# Altium PCB 1H-WSL007-2-1.PcbDoc (part 1 of 4)
Units mil, origin at the board's own origin, x right, y up, seen from the top; angles counter-clockwise.
Board outline 6030 x 4220 mil, 4 copper layers (Top Layer, Mid-Layer 1, Mid-Layer 2, Bottom Layer), stack 90.192 mil thick; 369 components, 15 nets, 801 pads, 1963 vias.
Unrouted connection lines stored in the file: 45.
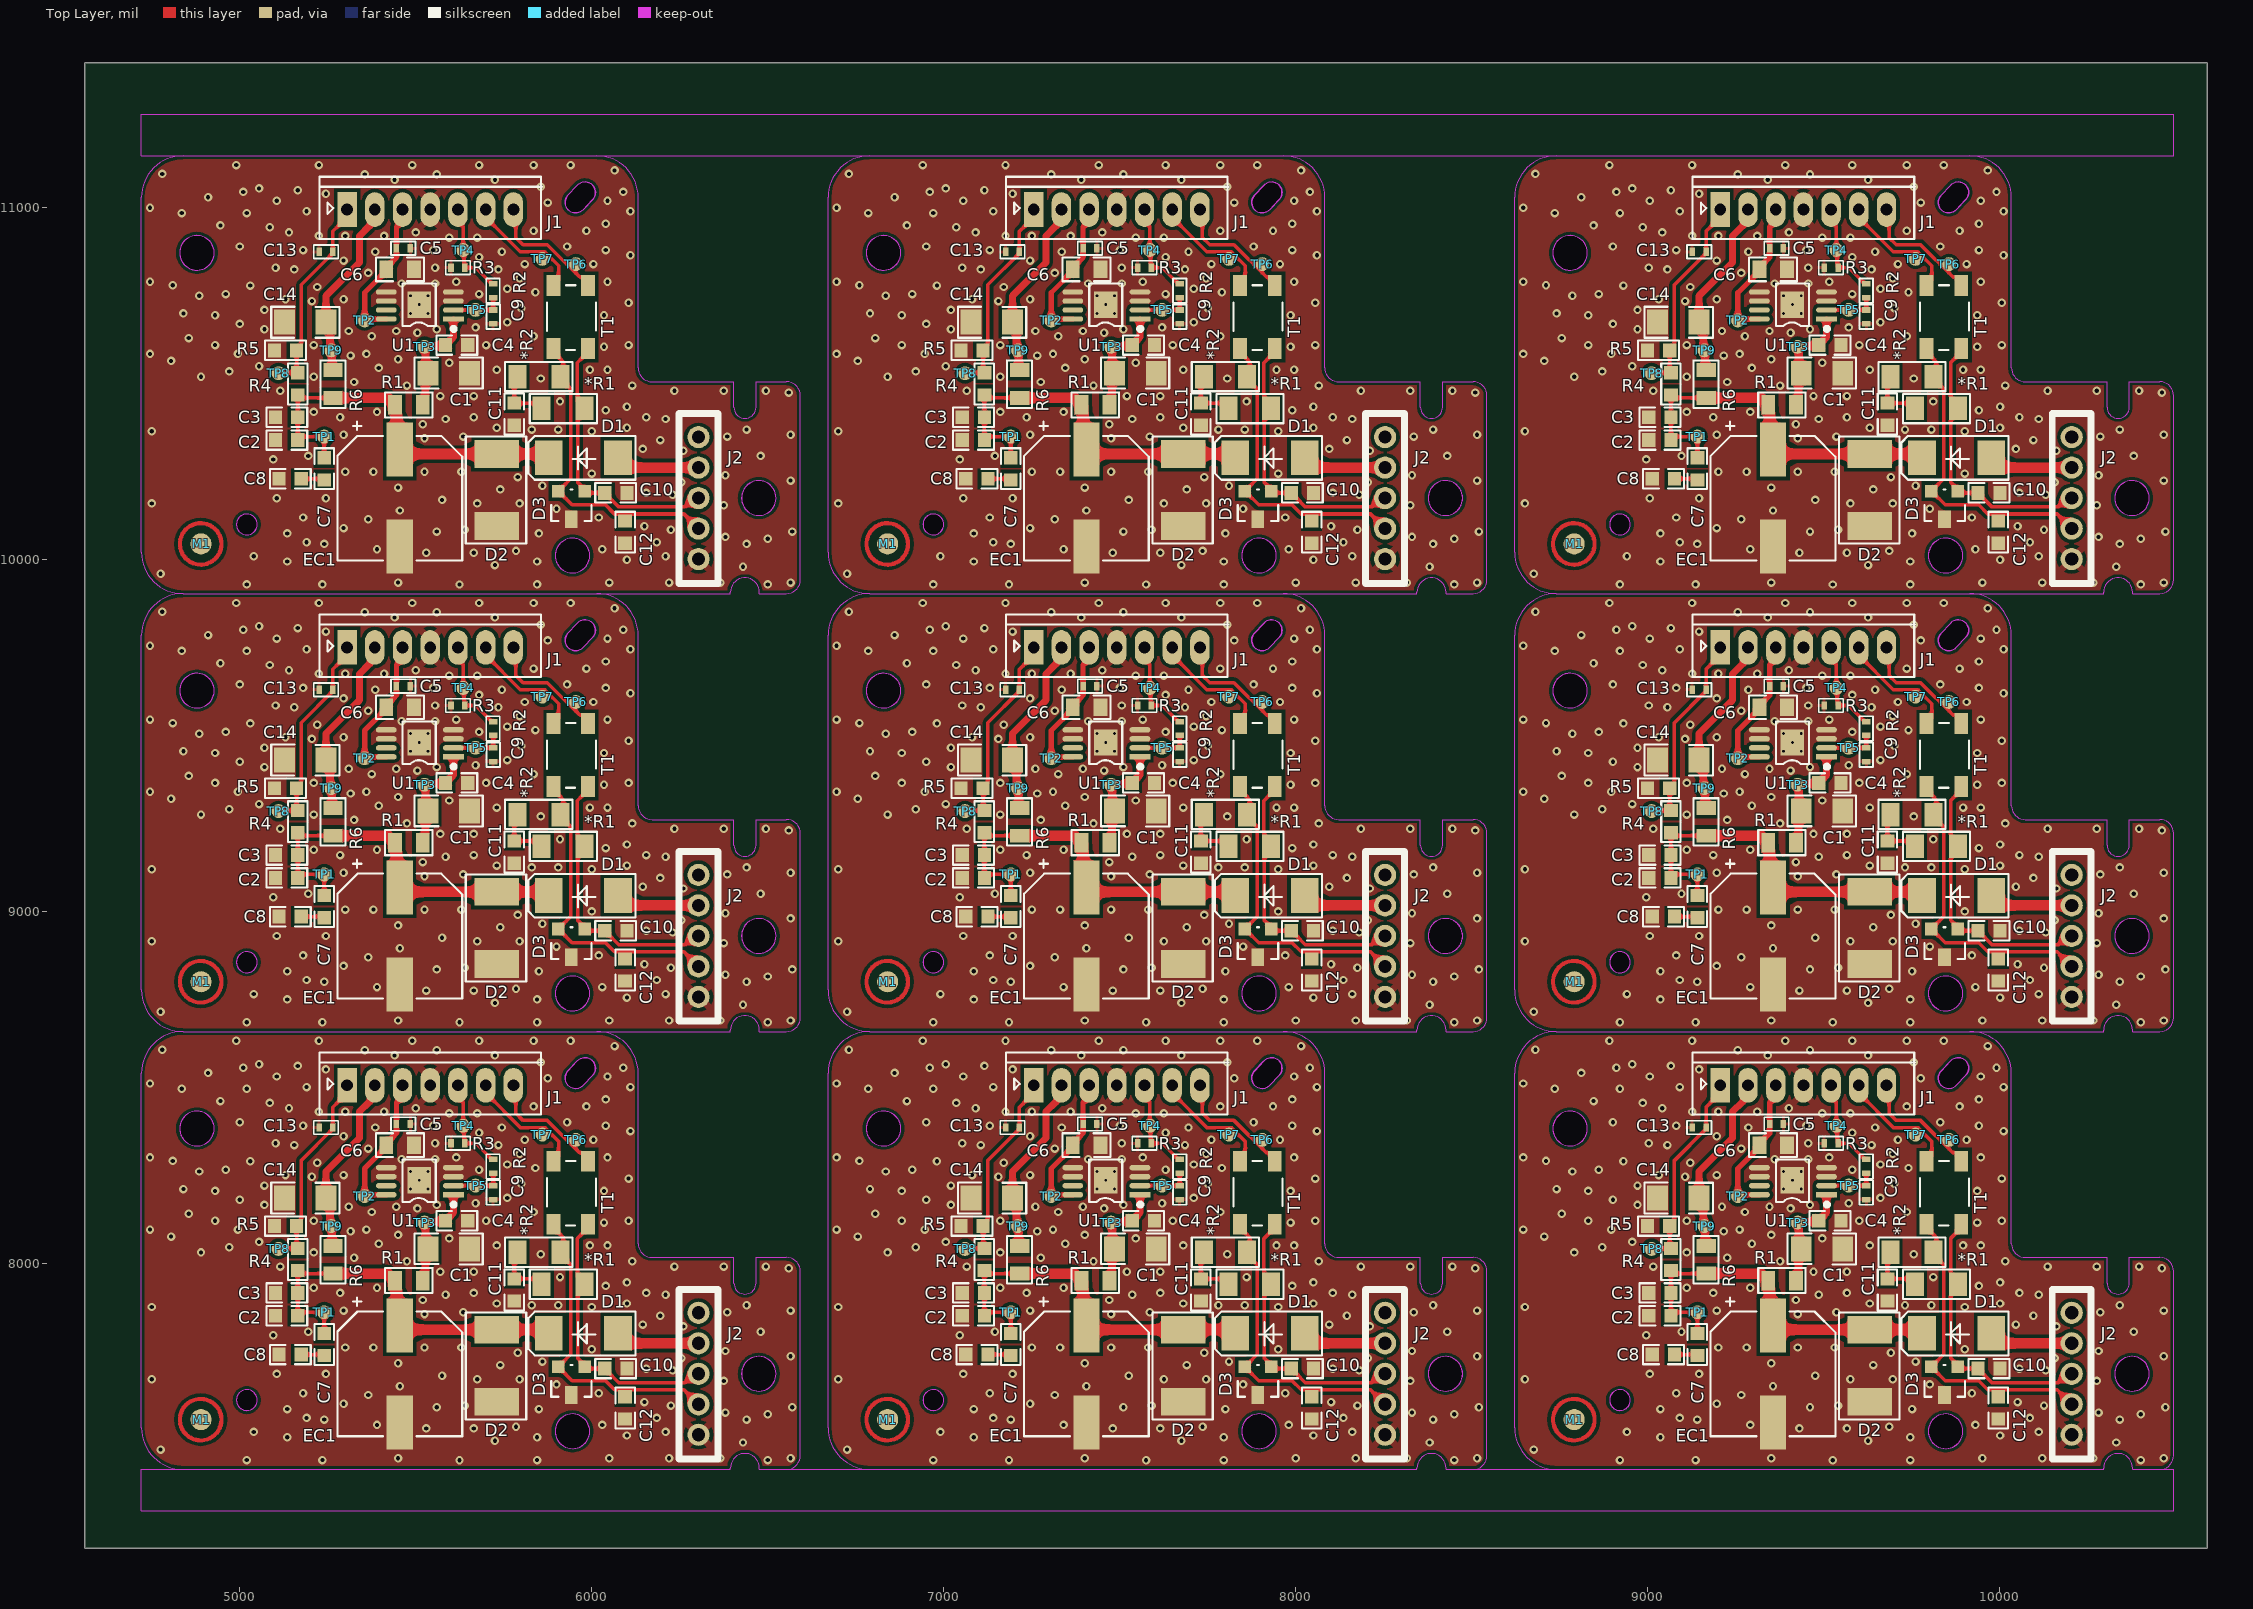
[diagram p0: Top Layer view]
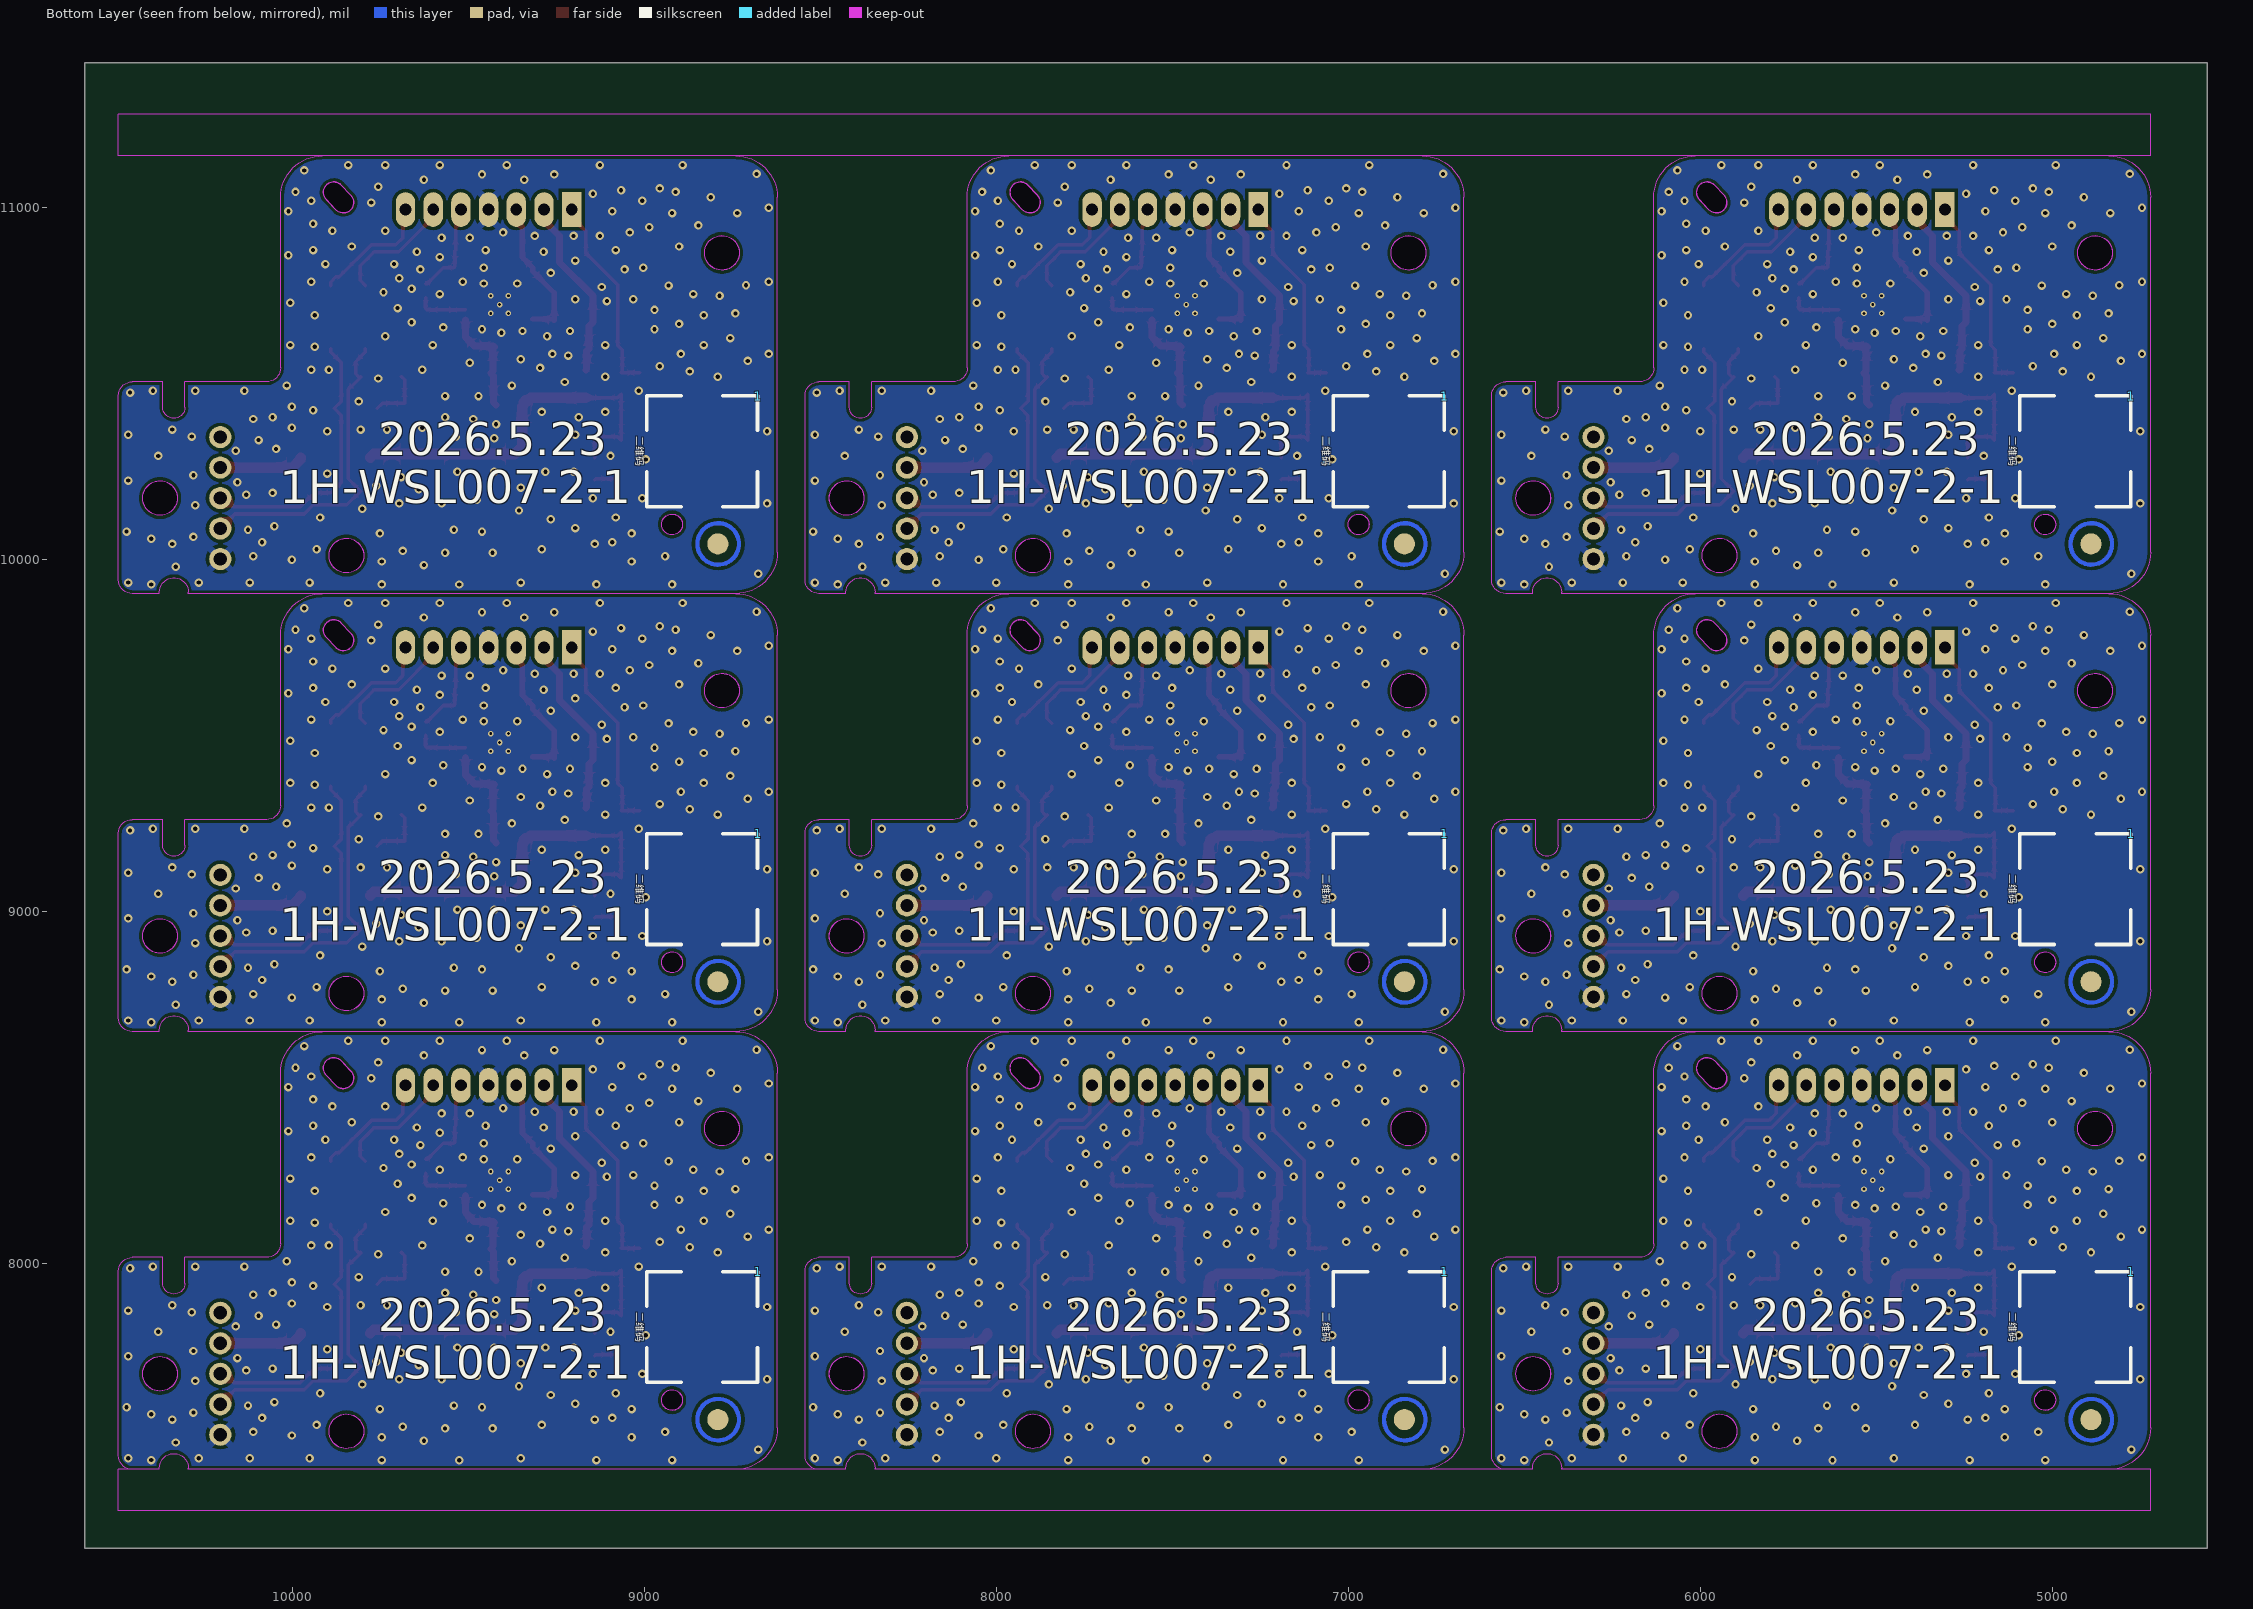
[diagram p1: Bottom Layer view, seen from below]
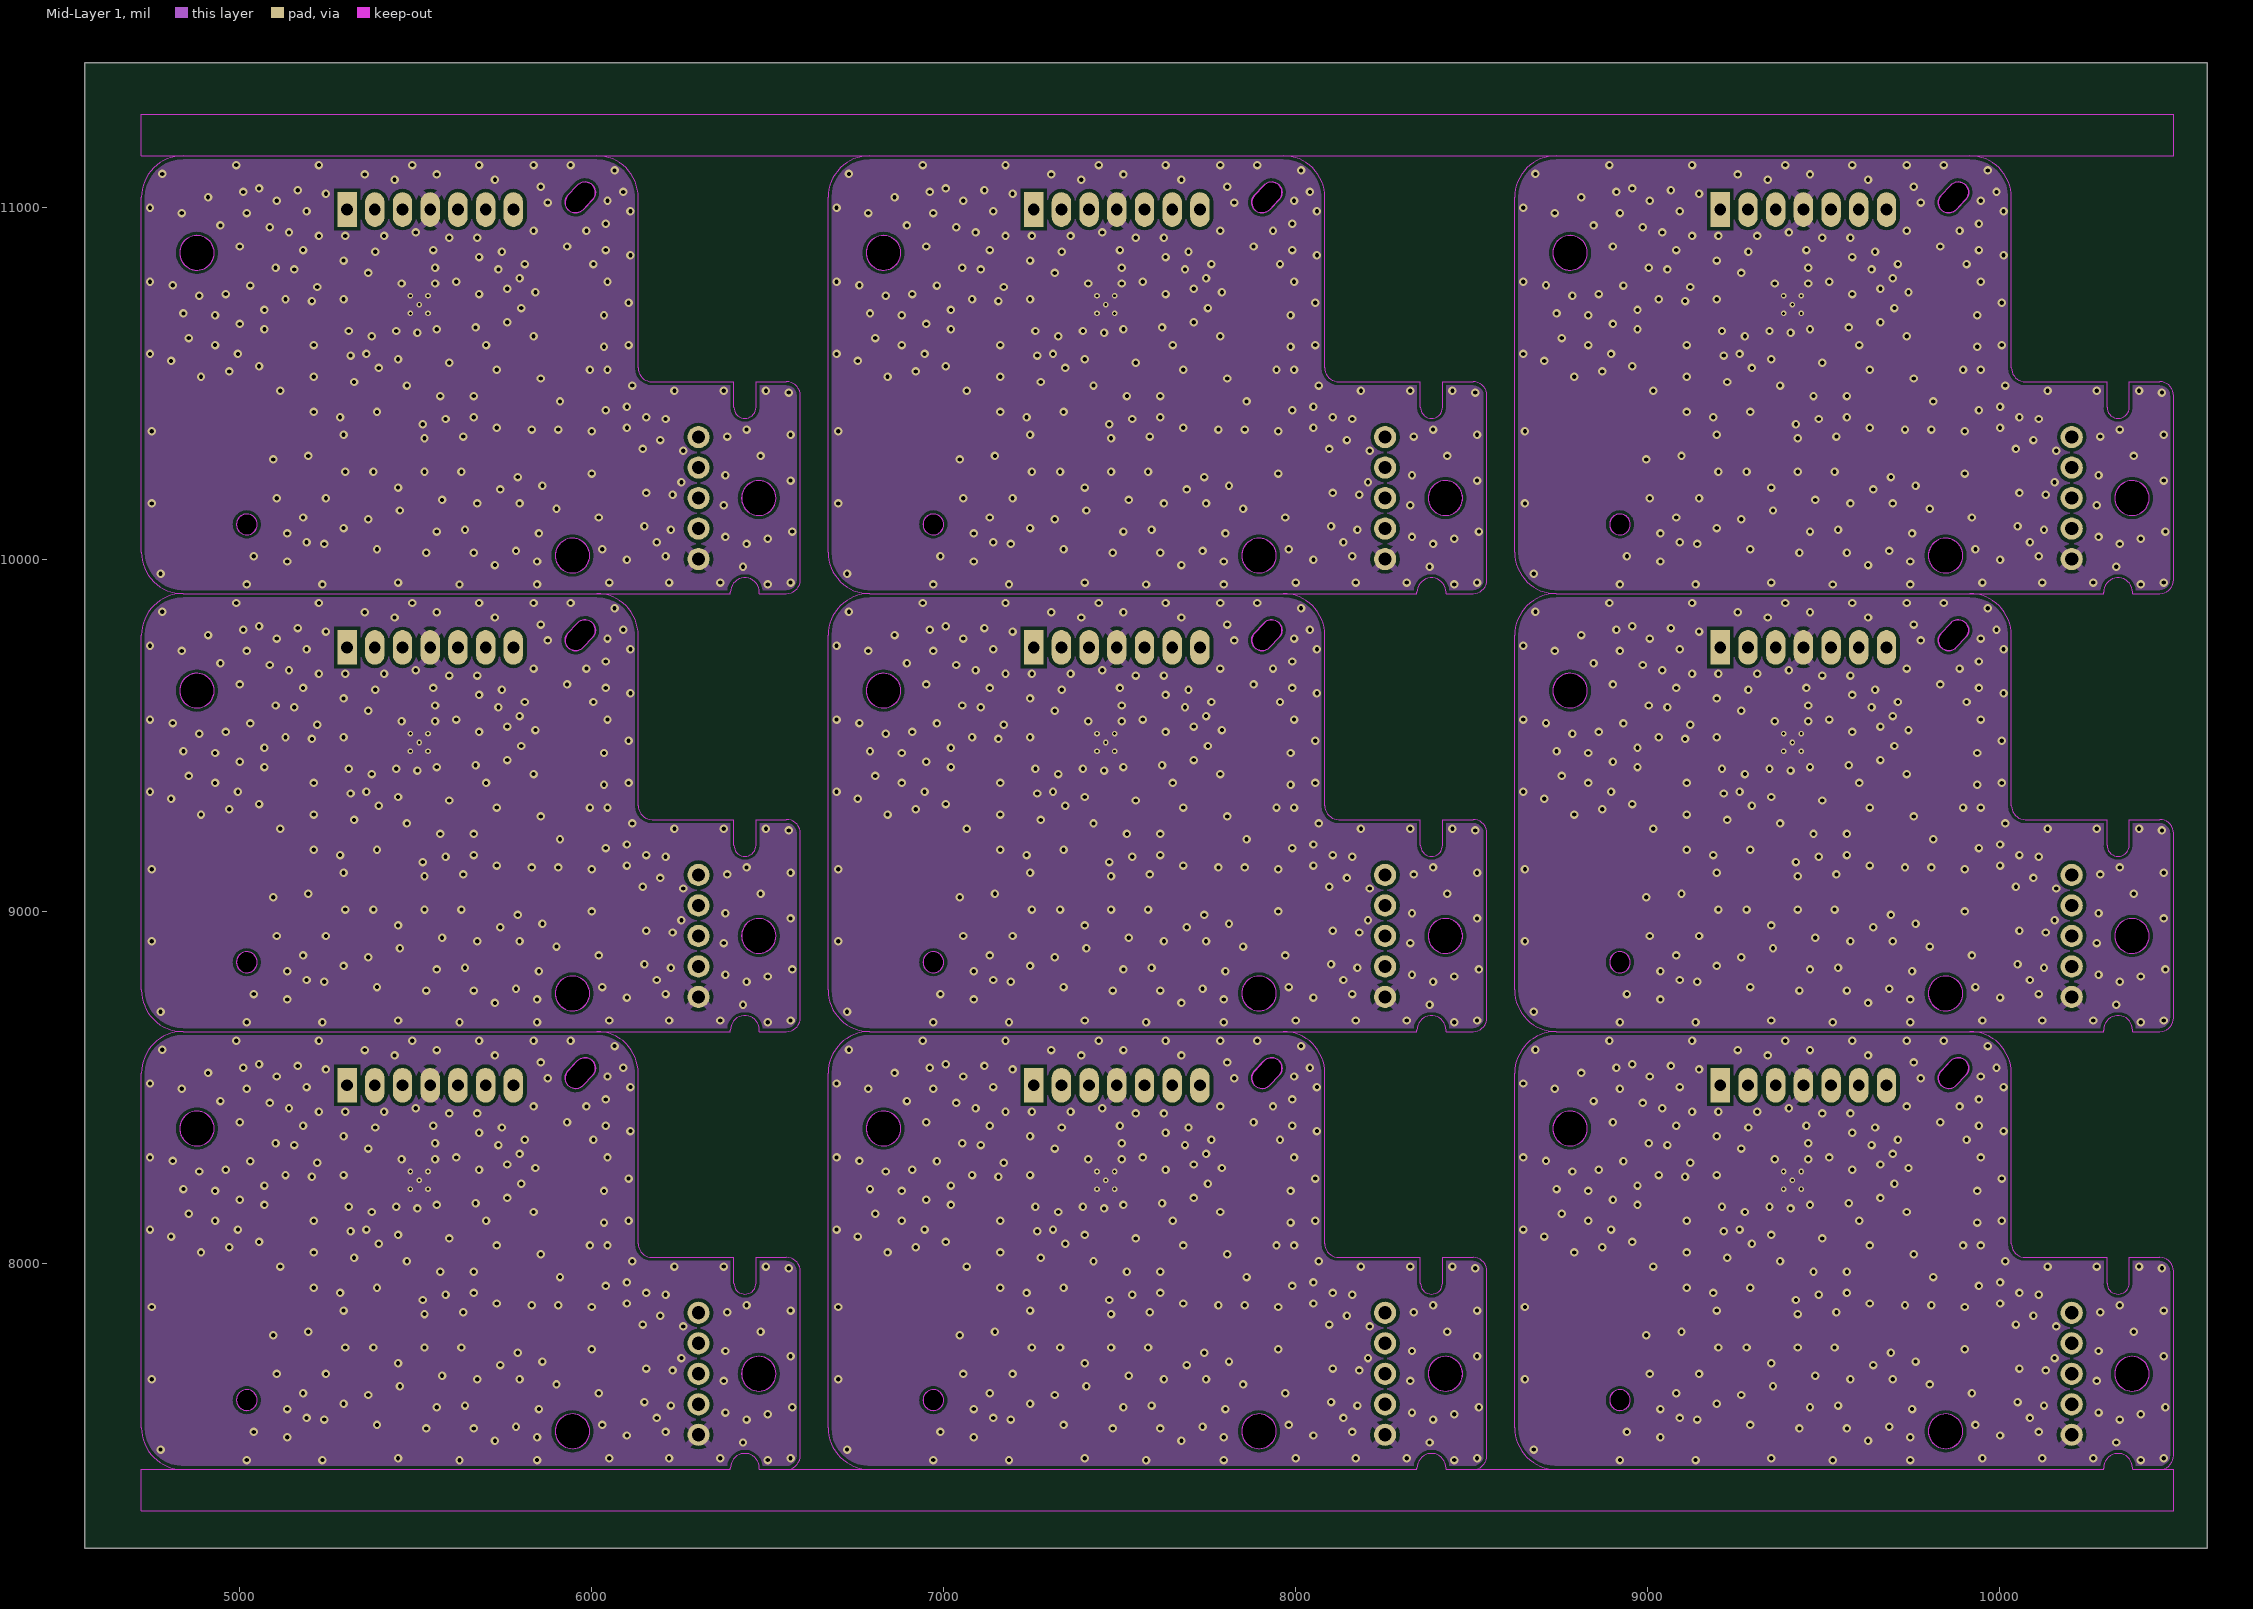
[diagram p2: Mid-Layer 1]
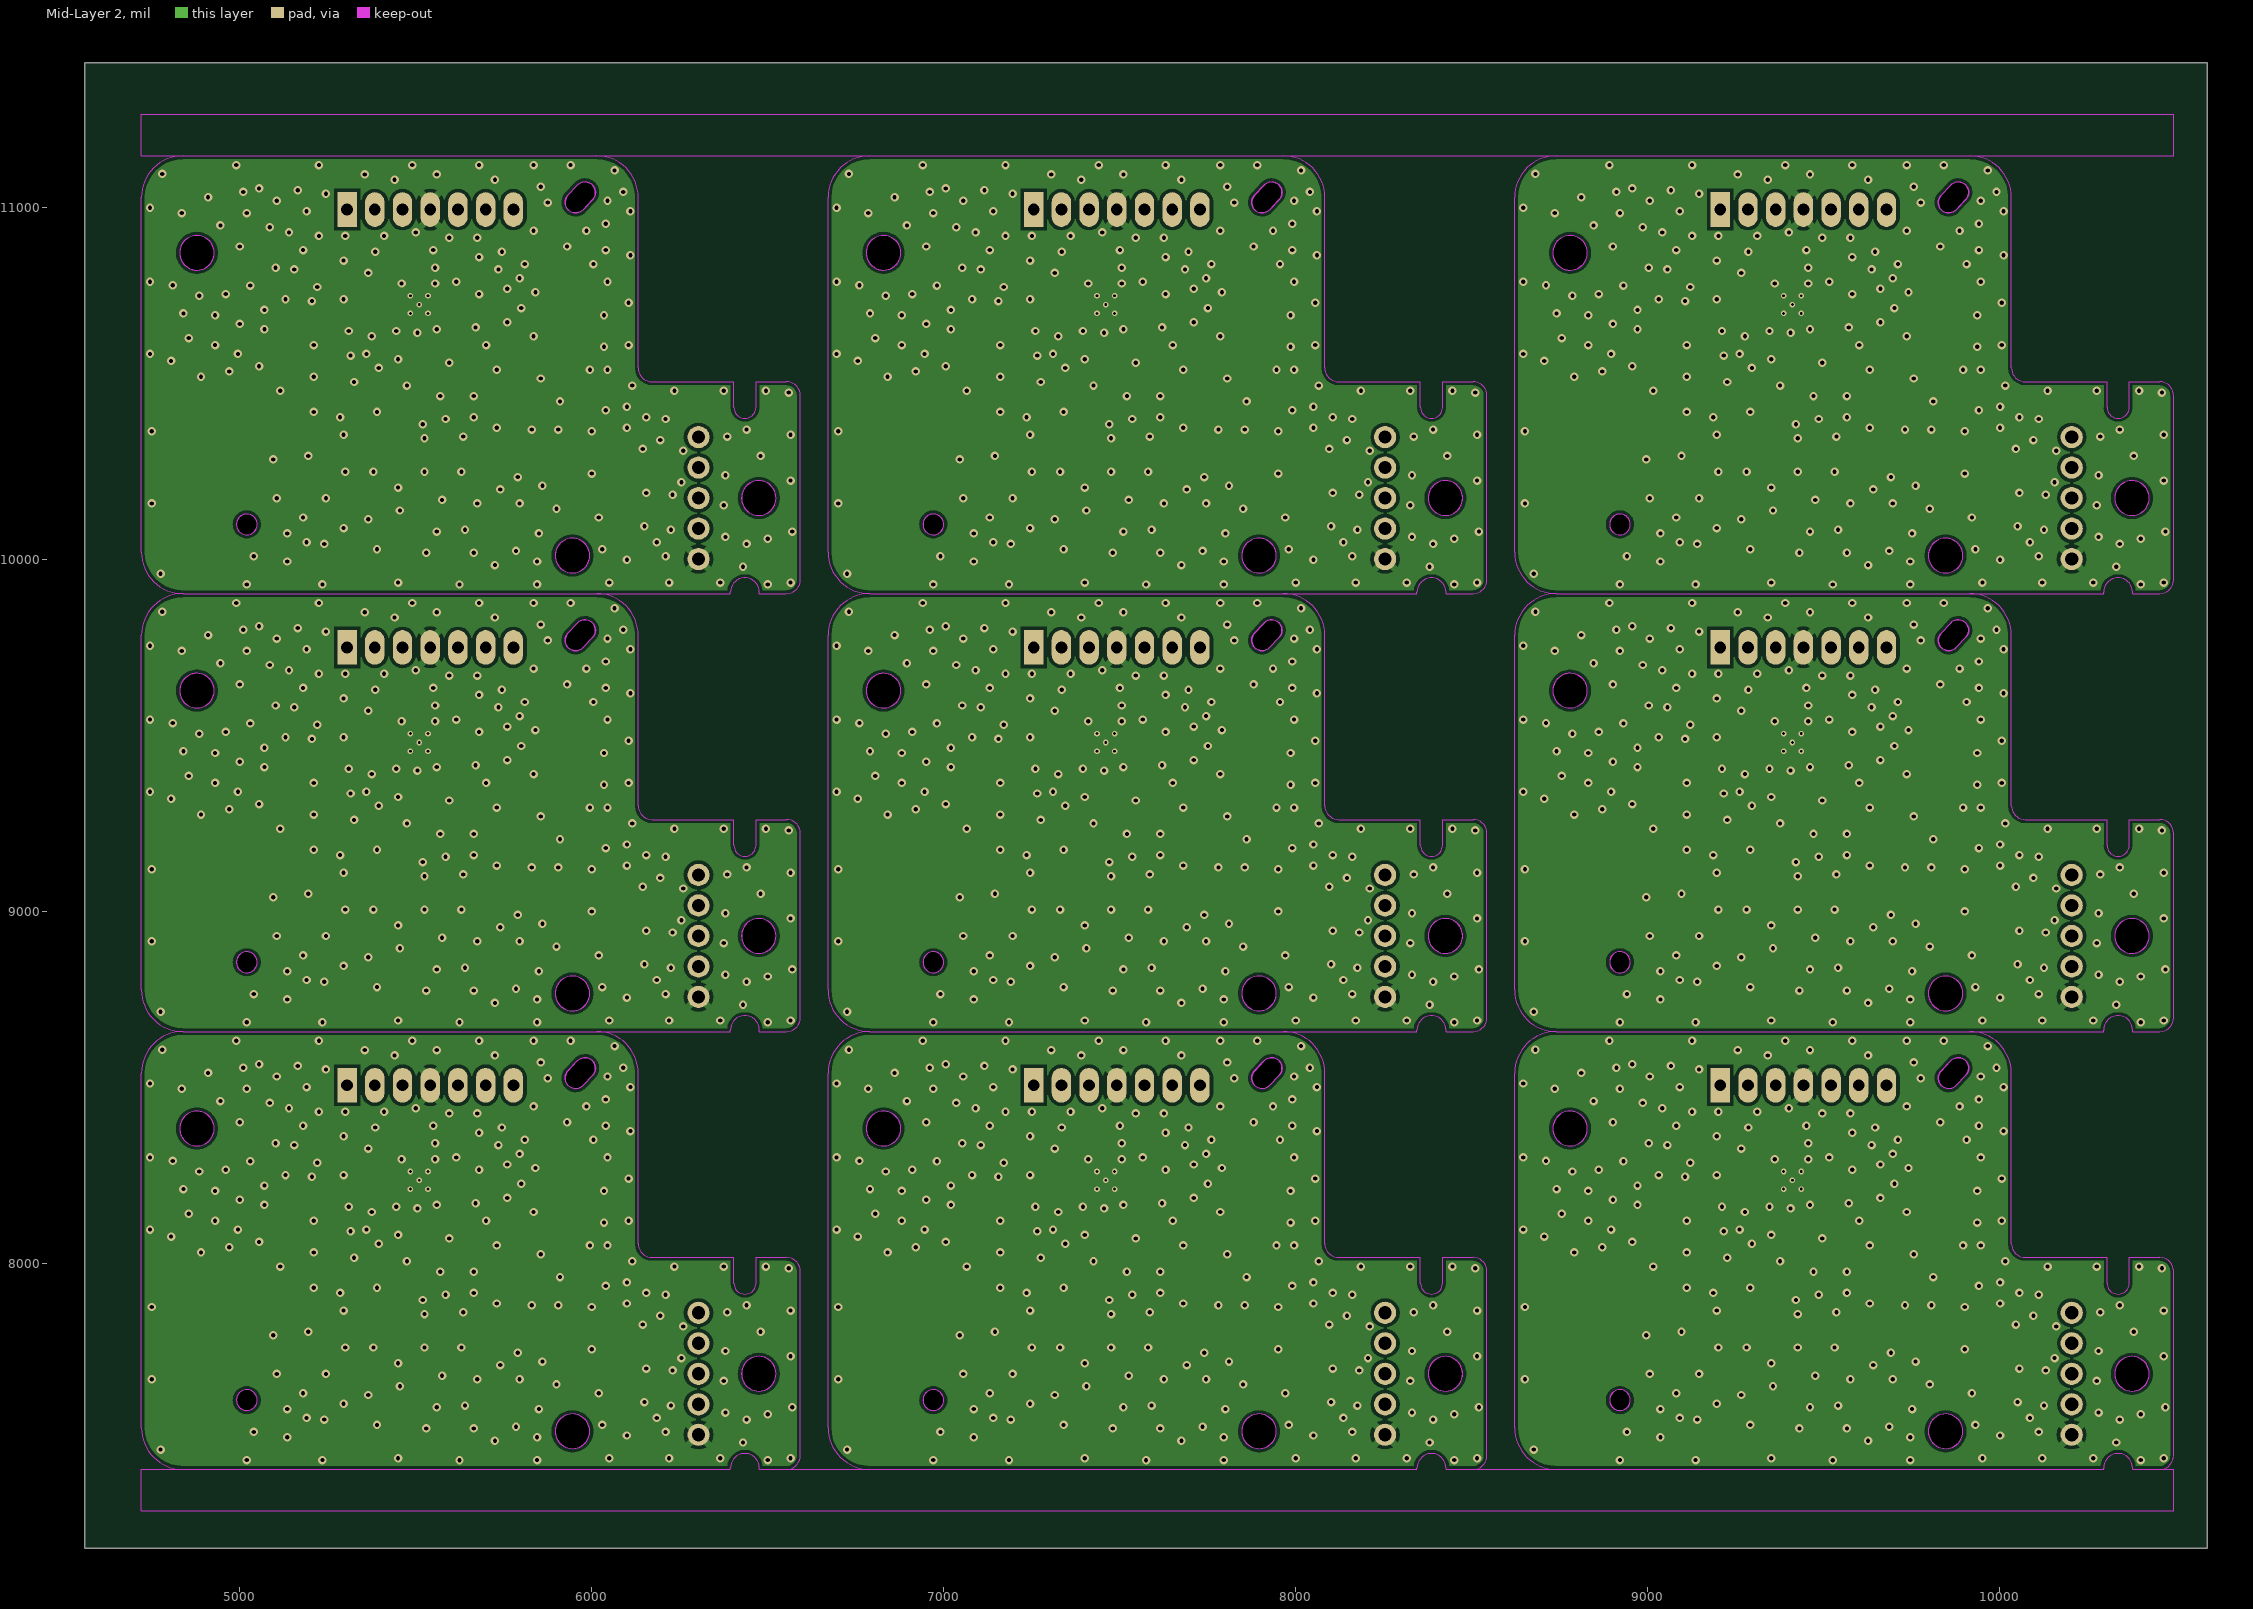
[diagram p3: Mid-Layer 2]

## Layer stack, top to bottom
Top Solder: solder mask 0.4, Solder Resist, Dk 3.5
Top Layer: signal copper 1.4
Dielectric 1: dielectric 59.3921, FR-4, Dk 4.8
Mid-Layer 1: signal copper 1.4
Dielectric2: dielectric 12.6, FR-4, Dk 4.8
Mid-Layer 2: signal copper 1.4
Dielectric3: dielectric 12.6, FR-4, Dk 4.8
Bottom Layer: signal copper 1.4
Bottom Solder: solder mask 0.4, Solder Resist, Dk 3.5

## Board outline
4560,7190 4560,11410 10590,11410 10590,7190
cut-out: 8892.12,10098.67 ccw(c8921.65,10098.67) 8921.65,10069.14 ccw(c8921.65,10098.67) 8951.18,10098.67 ccw(c8921.65,10098.67) 8921.65,10128.19 ccw(c8921.65,10098.67)
cut-out: 9797.64,10010.08 ccw(c9846.85,10010.08) 9846.85,9960.87 ccw(c9846.85,10010.08) 9896.06,10010.08 ccw(c9846.85,10010.08) 9846.85,10059.3 ccw(c9846.85,10010.08)
cut-out: 10327.17,10173.47 ccw(c10376.38,10173.47) 10376.38,10124.26 ccw(c10376.38,10173.47) 10425.59,10173.47 ccw(c10376.38,10173.47) 10376.38,10222.68 ccw(c10376.38,10173.47)
cut-out: 8730.71,10870.32 ccw(c8779.92,10870.32) 8779.92,10821.11 ccw(c8779.92,10870.32) 8829.14,10870.32 ccw(c8779.92,10870.32) 8779.92,10919.53 ccw(c8779.92,10870.32)
cut-out: 9834.01,11033.84 cw(c9834.25,11033.67) 9834.02,11033.85 cw(c9834.21,11033.7) 9834.03,11033.87 9860.99,11062.53 9861.01,11062.55 cw(c9882.71,11042.14) 9912.5,11042.14 cw(c9882.71,11042.14) 9904.42,11021.73 cw(c9904.26,11021.88) 9904.4,11021.72 9877.45,10993.05 cw(c9877.29,10993.2) 9877.44,10993.04 ccw(c9877.11,10993.36) 9877.45,10993.05 9877.44,10993.04 cw(c9855.74,11013.46) 9834.02,11033.85 cw(c9834.77,11033.16) 9834.04,11033.87 ccw(c9843.73,11025.41)
cut-out: 8892.12,8854.57 ccw(c8921.65,8854.57) 8921.65,8825.05 ccw(c8921.65,8854.57) 8951.18,8854.57 ccw(c8921.65,8854.57) 8921.65,8884.1 ccw(c8921.65,8854.57)
cut-out: 9797.64,8765.99 ccw(c9846.85,8765.99) 9846.85,8716.78 ccw(c9846.85,8765.99) 9896.06,8765.99 ccw(c9846.85,8765.99) 9846.85,8815.2 ccw(c9846.85,8765.99)
cut-out: 10327.17,8929.38 ccw(c10376.38,8929.38) 10376.38,8880.16 ccw(c10376.38,8929.38) 10425.59,8929.38 ccw(c10376.38,8929.38) 10376.38,8978.59 ccw(c10376.38,8929.38)
cut-out: 8730.71,9626.23 ccw(c8779.92,9626.23) 8779.92,9577.01 ccw(c8779.92,9626.23) 8829.14,9626.23 ccw(c8779.92,9626.23) 8779.92,9675.44 ccw(c8779.92,9626.23)
cut-out: 9834.01,9789.75 cw(c9834.25,9789.58) 9834.02,9789.76 cw(c9834.21,9789.61) 9834.03,9789.77 9860.99,9818.44 9861.01,9818.45 cw(c9882.71,9798.05) 9912.5,9798.05 cw(c9882.71,9798.05) 9904.42,9777.64 cw(c9904.26,9777.79) 9904.4,9777.62 9877.45,9748.96 cw(c9877.29,9749.1) 9877.44,9748.95 ccw(c9877.11,9749.26) 9877.45,9748.96 9877.44,9748.95 cw(c9855.74,9769.37) 9834.02,9789.76 cw(c9834.77,9789.07) 9834.04,9789.77 ccw(c9843.73,9781.32)
cut-out: 6941.34,10098.67 ccw(c6970.86,10098.67) 6970.86,10069.14 ccw(c6970.86,10098.67) 7000.39,10098.67 ccw(c6970.86,10098.67) 6970.86,10128.19 ccw(c6970.86,10098.67)
cut-out: 7846.85,10010.08 ccw(c7896.06,10010.08) 7896.06,9960.87 ccw(c7896.06,10010.08) 7945.28,10010.08 ccw(c7896.06,10010.08) 7896.06,10059.3 ccw(c7896.06,10010.08)
cut-out: 8376.38,10173.47 ccw(c8425.59,10173.47) 8425.59,10124.26 ccw(c8425.59,10173.47) 8474.8,10173.47 ccw(c8425.59,10173.47) 8425.59,10222.68 ccw(c8425.59,10173.47)
cut-out: 6779.92,10870.32 ccw(c6829.14,10870.32) 6829.14,10821.11 ccw(c6829.14,10870.32) 6878.35,10870.32 ccw(c6829.14,10870.32) 6829.14,10919.53 ccw(c6829.14,10870.32)
cut-out: 7883.23,11033.84 cw(c7883.46,11033.67) 7883.24,11033.85 cw(c7883.42,11033.7) 7883.25,11033.87 7910.2,11062.53 7910.22,11062.55 cw(c7931.92,11042.14) 7961.72,11042.14 cw(c7931.92,11042.14) 7953.63,11021.73 cw(c7953.47,11021.88) 7953.61,11021.72 7926.66,10993.05 cw(c7926.51,10993.2) 7926.65,10993.04 ccw(c7926.32,10993.36) 7926.66,10993.05 7926.65,10993.04 cw(c7904.95,11013.46) 7883.24,11033.85 cw(c7883.98,11033.16) 7883.25,11033.87 ccw(c7892.94,11025.41)
cut-out: 6941.34,8854.57 ccw(c6970.86,8854.57) 6970.86,8825.05 ccw(c6970.86,8854.57) 7000.39,8854.57 ccw(c6970.86,8854.57) 6970.86,8884.1 ccw(c6970.86,8854.57)
cut-out: 7846.85,8765.99 ccw(c7896.06,8765.99) 7896.06,8716.78 ccw(c7896.06,8765.99) 7945.28,8765.99 ccw(c7896.06,8765.99) 7896.06,8815.2 ccw(c7896.06,8765.99)
cut-out: 8376.38,8929.38 ccw(c8425.59,8929.38) 8425.59,8880.16 ccw(c8425.59,8929.38) 8474.8,8929.38 ccw(c8425.59,8929.38) 8425.59,8978.59 ccw(c8425.59,8929.38)
cut-out: 6779.92,9626.23 ccw(c6829.14,9626.23) 6829.14,9577.01 ccw(c6829.14,9626.23) 6878.35,9626.23 ccw(c6829.14,9626.23) 6829.14,9675.44 ccw(c6829.14,9626.23)
cut-out: 7883.23,9789.75 cw(c7883.46,9789.58) 7883.24,9789.76 cw(c7883.42,9789.61) 7883.25,9789.77 7910.2,9818.44 7910.22,9818.45 cw(c7931.92,9798.05) 7961.72,9798.05 cw(c7931.92,9798.05) 7953.63,9777.64 cw(c7953.47,9777.79) 7953.61,9777.62 7926.66,9748.96 cw(c7926.51,9749.1) 7926.65,9748.95 ccw(c7926.32,9749.26) 7926.66,9748.96 7926.65,9748.95 cw(c7904.95,9769.37) 7883.24,9789.76 cw(c7883.98,9789.07) 7883.25,9789.77 ccw(c7892.94,9781.32)
cut-out: 4990.55,10098.67 ccw(c5020.08,10098.67) 5020.08,10069.14 ccw(c5020.08,10098.67) 5049.6,10098.67 ccw(c5020.08,10098.67) 5020.08,10128.19 ccw(c5020.08,10098.67)
cut-out: 5896.06,10010.08 ccw(c5945.28,10010.08) 5945.28,9960.87 ccw(c5945.28,10010.08) 5994.49,10010.08 ccw(c5945.28,10010.08) 5945.28,10059.3 ccw(c5945.28,10010.08)
cut-out: 6425.59,10173.47 ccw(c6474.8,10173.47) 6474.8,10124.26 ccw(c6474.8,10173.47) 6524.02,10173.47 ccw(c6474.8,10173.47) 6474.8,10222.68 ccw(c6474.8,10173.47)
cut-out: 4829.14,10870.32 ccw(c4878.35,10870.32) 4878.35,10821.11 ccw(c4878.35,10870.32) 4927.56,10870.32 ccw(c4878.35,10870.32) 4878.35,10919.53 ccw(c4878.35,10870.32)
cut-out: 5932.44,11033.84 cw(c5932.67,11033.67) 5932.45,11033.85 cw(c5932.63,11033.7) 5932.46,11033.87 5959.41,11062.53 5959.43,11062.55 cw(c5981.14,11042.14) 6010.93,11042.14 cw(c5981.14,11042.14) 6002.84,11021.73 cw(c6002.68,11021.88) 6002.82,11021.72 5975.87,10993.05 cw(c5975.72,10993.2) 5975.86,10993.04 ccw(c5975.53,10993.36) 5975.87,10993.05 5975.86,10993.04 cw(c5954.17,11013.46) 5932.45,11033.85 cw(c5933.19,11033.16) 5932.46,11033.87 ccw(c5942.16,11025.41)
cut-out: 4990.55,8854.57 ccw(c5020.08,8854.57) 5020.08,8825.05 ccw(c5020.08,8854.57) 5049.6,8854.57 ccw(c5020.08,8854.57) 5020.08,8884.1 ccw(c5020.08,8854.57)
cut-out: 5896.06,8765.99 ccw(c5945.28,8765.99) 5945.28,8716.78 ccw(c5945.28,8765.99) 5994.49,8765.99 ccw(c5945.28,8765.99) 5945.28,8815.2 ccw(c5945.28,8765.99)
cut-out: 6425.59,8929.38 ccw(c6474.8,8929.38) 6474.8,8880.16 ccw(c6474.8,8929.38) 6524.02,8929.38 ccw(c6474.8,8929.38) 6474.8,8978.59 ccw(c6474.8,8929.38)
cut-out: 4829.14,9626.23 ccw(c4878.35,9626.23) 4878.35,9577.01 ccw(c4878.35,9626.23) 4927.56,9626.23 ccw(c4878.35,9626.23) 4878.35,9675.44 ccw(c4878.35,9626.23)
cut-out: 5932.44,9789.75 cw(c5932.67,9789.58) 5932.45,9789.76 cw(c5932.63,9789.61) 5932.46,9789.77 5959.41,9818.44 5959.43,9818.45 cw(c5981.14,9798.05) 6010.93,9798.05 cw(c5981.14,9798.05) 6002.84,9777.64 cw(c6002.68,9777.79) 6002.82,9777.62 5975.87,9748.96 cw(c5975.72,9749.1) 5975.86,9748.95 ccw(c5975.53,9749.26) 5975.87,9748.96 5975.86,9748.95 cw(c5954.17,9769.37) 5932.45,9789.76 cw(c5933.19,9789.07) 5932.46,9789.77 ccw(c5942.16,9781.32)
cut-out: 4990.55,7610.48 ccw(c5020.08,7610.48) 5020.08,7580.95 ccw(c5020.08,7610.48) 5049.6,7610.48 ccw(c5020.08,7610.48) 5020.08,7640.01 ccw(c5020.08,7610.48)
cut-out: 5896.06,7521.9 ccw(c5945.28,7521.9) 5945.28,7472.68 ccw(c5945.28,7521.9) 5994.49,7521.9 ccw(c5945.28,7521.9) 5945.28,7571.11 ccw(c5945.28,7521.9)
cut-out: 6425.59,7685.28 ccw(c6474.8,7685.28) 6474.8,7636.07 ccw(c6474.8,7685.28) 6524.02,7685.28 ccw(c6474.8,7685.28) 6474.8,7734.49 ccw(c6474.8,7685.28)
cut-out: 4829.14,8382.13 ccw(c4878.35,8382.13) 4878.35,8332.92 ccw(c4878.35,8382.13) 4927.56,8382.13 ccw(c4878.35,8382.13) 4878.35,8431.35 ccw(c4878.35,8382.13)
cut-out: 5932.44,8545.65 cw(c5932.67,8545.48) 5932.45,8545.67 cw(c5932.63,8545.51) 5932.46,8545.68 5959.41,8574.34 5959.43,8574.36 cw(c5981.14,8553.95) 6010.93,8553.95 cw(c5981.14,8553.95) 6002.84,8533.55 cw(c6002.68,8533.7) 6002.82,8533.53 5975.87,8504.86 cw(c5975.72,8505.01) 5975.86,8504.85 ccw(c5975.53,8505.17) 5975.87,8504.87 5975.86,8504.85 cw(c5954.17,8525.27) 5932.45,8545.67 cw(c5933.19,8544.97) 5932.46,8545.68 ccw(c5942.16,8537.23)
cut-out: 6941.34,7610.48 ccw(c6970.86,7610.48) 6970.86,7580.95 ccw(c6970.86,7610.48) 7000.39,7610.48 ccw(c6970.86,7610.48) 6970.86,7640.01 ccw(c6970.86,7610.48)
cut-out: 7846.85,7521.9 ccw(c7896.06,7521.9) 7896.06,7472.68 ccw(c7896.06,7521.9) 7945.28,7521.9 ccw(c7896.06,7521.9) 7896.06,7571.11 ccw(c7896.06,7521.9)
cut-out: 8376.38,7685.28 ccw(c8425.59,7685.28) 8425.59,7636.07 ccw(c8425.59,7685.28) 8474.8,7685.28 ccw(c8425.59,7685.28) 8425.59,7734.49 ccw(c8425.59,7685.28)
cut-out: 6779.92,8382.13 ccw(c6829.14,8382.13) 6829.14,8332.92 ccw(c6829.14,8382.13) 6878.35,8382.13 ccw(c6829.14,8382.13) 6829.14,8431.35 ccw(c6829.14,8382.13)
cut-out: 7883.23,8545.65 cw(c7883.46,8545.48) 7883.24,8545.67 cw(c7883.42,8545.51) 7883.25,8545.68 7910.2,8574.34 7910.22,8574.36 cw(c7931.92,8553.95) 7961.72,8553.95 cw(c7931.92,8553.95) 7953.63,8533.55 cw(c7953.47,8533.7) 7953.61,8533.53 7926.66,8504.86 cw(c7926.51,8505.01) 7926.65,8504.85 ccw(c7926.32,8505.17) 7926.66,8504.87 7926.65,8504.85 cw(c7904.95,8525.27) 7883.24,8545.67 cw(c7883.98,8544.97) 7883.25,8545.68 ccw(c7892.94,8537.23)
cut-out: 8892.12,7610.48 ccw(c8921.65,7610.48) 8921.65,7580.95 ccw(c8921.65,7610.48) 8951.18,7610.48 ccw(c8921.65,7610.48) 8921.65,7640.01 ccw(c8921.65,7610.48)
cut-out: 9797.64,7521.9 ccw(c9846.85,7521.9) 9846.85,7472.68 ccw(c9846.85,7521.9) 9896.06,7521.9 ccw(c9846.85,7521.9) 9846.85,7571.11 ccw(c9846.85,7521.9)
cut-out: 10327.17,7685.28 ccw(c10376.38,7685.28) 10376.38,7636.07 ccw(c10376.38,7685.28) 10425.59,7685.28 ccw(c10376.38,7685.28) 10376.38,7734.49 ccw(c10376.38,7685.28)
cut-out: 8730.71,8382.13 ccw(c8779.92,8382.13) 8779.92,8332.92 ccw(c8779.92,8382.13) 8829.14,8382.13 ccw(c8779.92,8382.13) 8779.92,8431.35 ccw(c8779.92,8382.13)
cut-out: 9834.01,8545.65 cw(c9834.25,8545.48) 9834.02,8545.67 cw(c9834.21,8545.51) 9834.03,8545.68 9860.99,8574.34 9861.01,8574.36 cw(c9882.71,8553.95) 9912.5,8553.95 cw(c9882.71,8553.95) 9904.42,8533.55 cw(c9904.26,8533.7) 9904.4,8533.53 9877.45,8504.86 cw(c9877.29,8505.01) 9877.44,8504.85 ccw(c9877.11,8505.17) 9877.45,8504.87 9877.44,8504.85 cw(c9855.74,8525.27) 9834.02,8545.67 cw(c9834.77,8544.97) 9834.04,8545.68 ccw(c9843.73,8537.23)

## Design rules (kind name [scope] priority, off if disabled: settings)
Clearance [All] p1: gap=9.5 ignorepadtopadclearanceinfootprint=FALSE except(0: Arc-Hole Track-Hole SMDPad-Hole THPad-Hole Via-Hole Fill-Hole Poly-Hole Region-Hole Text-Hole)
PlaneConnect [All] p1: planeconnectstyle=Direct reliefexpansion=20 reliefentries=4 reliefconductorwidth=10 reliefairgap=10
PolygonConnect [All] p1: connectstyle=Direct reliefconductorwidth=10 reliefentries=4 polygonreliefangle="90 Angle" airgapwidth=10
RoutingVias [All] p1: holewidth=28 width=50 viastyle="Through Hole" minholewidth=8 minwidth=16 maxholewidth=28 maxwidth=50
SolderMaskExpansion [All] p1: expansion=4
Width [All] p1: maxlimit=30 minlimit=10 preferedwidth=10 midlayer1_maxwidth=10 midlayer2_maxwidth=10 minimp=50.000000 maximp=50.000000 favimp=50.000000
29 further rules are at their usual default settings.

## Components (designator, comment, footprint, x,y, rotation, side; value= is the part's Value field where it differs from the comment)
1 "二微码" GF-二维码框 8676.57,10463.19 r270 bottom
1 "二微码" GF-二维码框 8676.57,9219.09 r270 bottom
1 "二微码" GF-二维码框 6725.79,10463.19 r270 bottom
1 "二微码" GF-二维码框 6725.79,9219.09 r270 bottom
1 "二微码" GF-二维码框 4775,10463.19 r270 bottom
1 "二微码" GF-二维码框 4775,9219.09 r270 bottom
1 "二微码" GF-二维码框 4775,7975 r270 bottom
1 "二微码" GF-二维码框 6725.79,7975 r270 bottom
1 "二微码" GF-二维码框 8676.57,7975 r270 bottom
*R1 "3.3K/1206±1%" R1206-GF 9820.55,10428.19 r0 top
*R1 "3.3K/1206±1%" R1206-GF 9820.55,9184.09 r0 top
*R1 "3.3K/1206±1%" R1206-GF 7869.76,10428.19 r0 top
*R1 "3.3K/1206±1%" R1206-GF 7869.76,9184.09 r0 top
*R1 "3.3K/1206±1%" R1206-GF 5918.98,10428.19 r0 top
*R1 "3.3K/1206±1%" R1206-GF 5918.98,9184.09 r0 top
*R1 "3.3K/1206±1%" R1206-GF 5918.98,7940 r0 top
*R1 "3.3K/1206±1%" R1206-GF 7869.76,7940 r0 top
*R1 "3.3K/1206±1%" R1206-GF 9820.55,7940 r0 top
*R2 "3.3K/1206±1%" R1206-GF 9751.57,10518.19 r180 top
*R2 "3.3K/1206±1%" R1206-GF 9751.57,9274.09 r180 top
*R2 "3.3K/1206±1%" R1206-GF 7800.79,10518.19 r180 top
*R2 "3.3K/1206±1%" R1206-GF 7800.79,9274.09 r180 top
*R2 "3.3K/1206±1%" R1206-GF 5850,10518.19 r180 top
*R2 "3.3K/1206±1%" R1206-GF 5850,9274.09 r180 top
*R2 "3.3K/1206±1%" R1206-GF 5850,8030 r180 top
*R2 "3.3K/1206±1%" R1206-GF 7800.79,8030 r180 top
*R2 "3.3K/1206±1%" R1206-GF 9751.57,8030 r180 top
C1 "4.7UF/50V" C1206-GF 9554.68,10528.19 r180 top
C1 "4.7UF/50V" C1206-GF 9554.68,9284.09 r180 top
C1 "4.7UF/50V" C1206-GF 7603.9,10528.19 r180 top
C1 "4.7UF/50V" C1206-GF 7603.9,9284.09 r180 top
C1 "4.7UF/50V" C1206-GF 5653.11,10528.19 r180 top
C1 "4.7UF/50V" C1206-GF 5653.11,9284.09 r180 top
C1 "4.7UF/50V" C1206-GF 5653.11,8040 r180 top
C1 "4.7UF/50V" C1206-GF 7603.9,8040 r180 top
C1 "4.7UF/50V" C1206-GF 9554.68,8040 r180 top
C2 "47NF" C0603-GF 9066.57,10338.19 r180 top
C2 "47NF" C0603-GF 9066.57,9094.09 r180 top
C2 "47NF" C0603-GF 7115.79,10338.19 r180 top
C2 "47NF" C0603-GF 7115.79,9094.09 r180 top
C2 "47NF" C0603-GF 5165,10338.19 r180 top
C2 "47NF" C0603-GF 5165,9094.09 r180 top
C2 "47NF" C0603-GF 5165,7850 r180 top
C2 "47NF" C0603-GF 7115.79,7850 r180 top
C2 "47NF" C0603-GF 9066.57,7850 r180 top
C3 "470NF" C0603-GF 9066.57,10403.19 r180 top
C3 "470NF" C0603-GF 9066.57,9159.09 r180 top
C3 "470NF" C0603-GF 7115.79,10403.19 r180 top
C3 "470NF" C0603-GF 7115.79,9159.09 r180 top
C3 "470NF" C0603-GF 5165,10403.19 r180 top
C3 "470NF" C0603-GF 5165,9159.09 r180 top
C3 "470NF" C0603-GF 5165,7915 r180 top
C3 "470NF" C0603-GF 7115.79,7915 r180 top
C3 "470NF" C0603-GF 9066.57,7915 r180 top
C4 "100NF/100V" C0603-GF 9549.57,10608.19 r180 top
C4 "100NF/100V" C0603-GF 9549.57,9364.09 r180 top
C4 "100NF/100V" C0603-GF 7598.78,10608.19 r180 top
C4 "100NF/100V" C0603-GF 7598.78,9364.09 r180 top
C4 "100NF/100V" C0603-GF 5647.99,10608.19 r180 top
C4 "100NF/100V" C0603-GF 5647.99,9364.09 r180 top
C4 "100NF/100V" C0603-GF 5647.99,8120 r180 top
C4 "100NF/100V" C0603-GF 7598.78,8120 r180 top
C4 "100NF/100V" C0603-GF 9549.57,8120 r180 top
C5 "100NF" C0402-GF 9366.57,10883.19 r180 top
C5 "100NF" C0402-GF 9366.57,9639.09 r180 top
C5 "100NF" C0402-GF 7415.79,10883.19 r180 top
C5 "100NF" C0402-GF 7415.79,9639.09 r180 top
C5 "100NF" C0402-GF 5465,10883.19 r180 top
C5 "100NF" C0402-GF 5465,9639.09 r180 top
C5 "100NF" C0402-GF 5465,8395 r180 top
C5 "100NF" C0402-GF 7415.79,8395 r180 top
C5 "100NF" C0402-GF 9366.57,8395 r180 top
C6 "10UF/10V" C0805-GF 9317.83,10823.19 r0 top
C6 "10UF/10V" C0805-GF 9317.83,9579.09 r0 top
C6 "10UF/10V" C0805-GF 7367.05,10823.19 r0 top
C6 "10UF/10V" C0805-GF 7367.05,9579.09 r0 top
C6 "10UF/10V" C0805-GF 5416.26,10823.19 r0 top
C6 "10UF/10V" C0805-GF 5416.26,9579.09 r0 top
C6 "10UF/10V" C0805-GF 5416.26,8335 r0 top
C6 "10UF/10V" C0805-GF 7367.05,8335 r0 top
C6 "10UF/10V" C0805-GF 9317.83,8335 r0 top
C7 "103/100V" C0603-GF 9141.57,10288.19 r270 top
C7 "103/100V" C0603-GF 9141.57,9044.09 r270 top
C7 "103/100V" C0603-GF 7190.79,10288.19 r270 top
C7 "103/100V" C0603-GF 7190.79,9044.09 r270 top
C7 "103/100V" C0603-GF 5240,10288.19 r270 top
C7 "103/100V" C0603-GF 5240,9044.09 r270 top
C7 "103/100V" C0603-GF 5240,7800 r270 top
C7 "103/100V" C0603-GF 7190.79,7800 r270 top
C7 "103/100V" C0603-GF 9141.57,7800 r270 top
C8 "103/100V" C0603-GF 9076.57,10228.19 r180 top
C8 "103/100V" C0603-GF 9076.57,8984.09 r180 top
C8 "103/100V" C0603-GF 7125.79,10228.19 r180 top
C8 "103/100V" C0603-GF 7125.79,8984.09 r180 top
C8 "103/100V" C0603-GF 5175,10228.19 r180 top
C8 "103/100V" C0603-GF 5175,8984.09 r180 top
C8 "103/100V" C0603-GF 5175,7740 r180 top
C8 "103/100V" C0603-GF 7125.79,7740 r180 top
C8 "103/100V" C0603-GF 9076.57,7740 r180 top
C9 "1NF" C0402-GF 9621.57,10688.19 r90 top
C9 "1NF" C0402-GF 9621.57,9444.09 r90 top
C9 "1NF" C0402-GF 7670.79,10688.19 r90 top
C9 "1NF" C0402-GF 7670.79,9444.09 r90 top
C9 "1NF" C0402-GF 5720,10688.19 r90 top
C9 "1NF" C0402-GF 5720,9444.09 r90 top
C9 "1NF" C0402-GF 5720,8200 r90 top
C9 "1NF" C0402-GF 7670.79,8200 r90 top
C9 "1NF" C0402-GF 9621.57,8200 r90 top
C10 "47PF/100V" C0603-GF 9938.58,10188.19 r0 top
C10 "47PF/100V" C0603-GF 9938.58,8944.09 r0 top
C10 "47PF/100V" C0603-GF 7987.8,10188.19 r0 top
C10 "47PF/100V" C0603-GF 7987.8,8944.09 r0 top
C10 "47PF/100V" C0603-GF 6037.01,10188.19 r0 top
C10 "47PF/100V" C0603-GF 6037.01,8944.09 r0 top
C10 "47PF/100V" C0603-GF 6037.01,7700 r0 top
C10 "47PF/100V" C0603-GF 7987.8,7700 r0 top
C10 "47PF/100V" C0603-GF 9938.58,7700 r0 top
C11 "4.7NF" C0603-GF 9681.57,10443.19 r270 top
C11 "4.7NF" C0603-GF 9681.57,9199.09 r270 top
C11 "4.7NF" C0603-GF 7730.79,10443.19 r270 top
C11 "4.7NF" C0603-GF 7730.79,9199.09 r270 top
C11 "4.7NF" C0603-GF 5780,10443.19 r270 top
C11 "4.7NF" C0603-GF 5780,9199.09 r270 top
C11 "4.7NF" C0603-GF 5780,7955 r270 top
C11 "4.7NF" C0603-GF 7730.79,7955 r270 top
C11 "4.7NF" C0603-GF 9681.57,7955 r270 top
C12 "47PF/100V" C0603-GF 9996.57,10045.19 r90 top
C12 "47PF/100V" C0603-GF 9996.57,8801.1 r90 top
C12 "47PF/100V" C0603-GF 8045.79,10045.19 r90 top
C12 "47PF/100V" C0603-GF 8045.79,8801.1 r90 top
C12 "47PF/100V" C0603-GF 6095,10045.19 r90 top
C12 "47PF/100V" C0603-GF 6095,8801.1 r90 top
C12 "47PF/100V" C0603-GF 6095,7557.01 r90 top
C12 "47PF/100V" C0603-GF 8045.79,7557.01 r90 top
C12 "47PF/100V" C0603-GF 9996.57,7557.01 r90 top
C13 "100NF" C0402-GF 9146.57,10873.19 r0 top
C13 "100NF" C0402-GF 9146.57,9629.09 r0 top
C13 "100NF" C0402-GF 7195.79,10873.19 r0 top
C13 "100NF" C0402-GF 7195.79,9629.09 r0 top
C13 "100NF" C0402-GF 5245,10873.19 r0 top
C13 "100NF" C0402-GF 5245,9629.09 r0 top
C13 "100NF" C0402-GF 5245,8385 r0 top
C13 "100NF" C0402-GF 7195.79,8385 r0 top
C13 "100NF" C0402-GF 9146.57,8385 r0 top
C14 "4.7UF/50V" C1206-GF 9028.46,10673.19 r0 top
C14 "4.7UF/50V" C1206-GF 9028.46,9429.09 r0 top
C14 "4.7UF/50V" C1206-GF 7077.68,10673.19 r0 top
C14 "4.7UF/50V" C1206-GF 7077.68,9429.09 r0 top
C14 "4.7UF/50V" C1206-GF 5126.89,10673.19 r0 top
C14 "4.7UF/50V" C1206-GF 5126.89,9429.09 r0 top
C14 "4.7UF/50V" C1206-GF 5126.89,8185 r0 top
C14 "4.7UF/50V" C1206-GF 7077.68,8185 r0 top
C14 "4.7UF/50V" C1206-GF 9028.46,8185 r0 top
D1 "GS1M-AU" D-SMA 9976.57,10288.19 r180 top
D1 "GS1M-AU" D-SMA 9976.57,9044.09 r180 top
D1 "GS1M-AU" D-SMA 8025.79,10288.19 r180 top
D1 "GS1M-AU" D-SMA 8025.79,9044.09 r180 top
D1 "GS1M-AU" D-SMA 6075,10288.19 r180 top
D1 "GS1M-AU" D-SMA 6075,9044.09 r180 top
D1 "GS1M-AU" D-SMA 6075,7800 r180 top
D1 "GS1M-AU" D-SMA 8025.79,7800 r180 top
D1 "GS1M-AU" D-SMA 9976.57,7800 r180 top
D2 "SMBJ33CA" D-SMB-TVS 9631.57,10093.19 r90 top
D2 "SMBJ33CA" D-SMB-TVS 9631.57,8849.09 r90 top
D2 "SMBJ33CA" D-SMB-TVS 7680.79,10093.19 r90 top
D2 "SMBJ33CA" D-SMB-TVS 7680.79,8849.09 r90 top
D2 "SMBJ33CA" D-SMB-TVS 5730,10093.19 r90 top
D2 "SMBJ33CA" D-SMB-TVS 5730,8849.09 r90 top
D2 "SMBJ33CA" D-SMB-TVS 5730,7605 r90 top
D2 "SMBJ33CA" D-SMB-TVS 7680.79,7605 r90 top
D2 "SMBJ33CA" D-SMB-TVS 9631.57,7605 r90 top
D3 "AESD24G2B" D-SOT-23 9844.41,10153.52 r180 top
D3 "AESD24G2B" D-SOT-23 9844.41,8909.43 r180 top
D3 "AESD24G2B" D-SOT-23 7893.62,10153.52 r180 top
D3 "AESD24G2B" D-SOT-23 7893.62,8909.43 r180 top
D3 "AESD24G2B" D-SOT-23 5942.84,10153.52 r180 top
D3 "AESD24G2B" D-SOT-23 5942.84,8909.43 r180 top
D3 "AESD24G2B" D-SOT-23 5942.84,7665.34 r180 top
D3 "AESD24G2B" D-SOT-23 7893.62,7665.34 r180 top
D3 "AESD24G2B" D-SOT-23 9844.41,7665.34 r180 top
EC1 "100UF/35V" EC8X10 9356.57,10173.19 r90 top
EC1 "100UF/35V" EC8X10 9356.57,8929.09 r90 top
EC1 "100UF/35V" EC8X10 7405.79,10173.19 r90 top
EC1 "100UF/35V" EC8X10 7405.79,8929.09 r90 top
EC1 "100UF/35V" EC8X10 5455,10173.19 r90 top
EC1 "100UF/35V" EC8X10 5455,8929.09 r90 top
EC1 "100UF/35V" EC8X10 5455,7685 r90 top
EC1 "100UF/35V" EC8X10 7405.79,7685 r90 top
EC1 "100UF/35V" EC8X10 9356.57,7685 r90 top
J1 "R2003HS-7P" 正耀-R2003HS-7P 9206.61,10993.19 r0 top
J1 "R2003HS-7P" 正耀-R2003HS-7P 9206.61,9749.09 r0 top
J1 "R2003HS-7P" 正耀-R2003HS-7P 7255.83,10993.19 r0 top
J1 "R2003HS-7P" 正耀-R2003HS-7P 7255.83,9749.09 r0 top
J1 "R2003HS-7P" 正耀-R2003HS-7P 5305.04,10993.19 r0 top
J1 "R2003HS-7P" 正耀-R2003HS-7P 5305.04,9749.09 r0 top
J1 "R2003HS-7P" 正耀-R2003HS-7P 5305.04,8505 r0 top
J1 "R2003HS-7P" 正耀-R2003HS-7P 7255.83,8505 r0 top
J1 "R2003HS-7P" 正耀-R2003HS-7P 9206.61,8505 r0 top
J2 "排针2.2mm-5" PH2.2-5 10205.12,10173.46 r90 top
J2 "排针2.2mm-5" PH2.2-5 10205.12,8929.37 r90 top
J2 "排针2.2mm-5" PH2.2-5 8254.33,10173.46 r90 top
J2 "排针2.2mm-5" PH2.2-5 8254.33,8929.37 r90 top
J2 "排针2.2mm-5" PH2.2-5 6303.54,10173.46 r90 top
J2 "排针2.2mm-5" PH2.2-5 6303.54,8929.37 r90 top
J2 "排针2.2mm-5" PH2.2-5 6303.54,7685.28 r90 top
J2 "排针2.2mm-5" PH2.2-5 8254.33,7685.28 r90 top
J2 "排针2.2mm-5" PH2.2-5 10205.12,7685.28 r90 top
M1 "Mark" Mark 8791.57,10043.19 r180 top
M1 "Mark" Mark 8791.57,8799.09 r180 top
M1 "Mark" Mark 6840.79,10043.19 r180 top
M1 "Mark" Mark 6840.79,8799.09 r180 top
M1 "Mark" Mark 4890,10043.19 r180 top
M1 "Mark" Mark 4890,8799.09 r180 top
M1 "Mark" Mark 4890,7555 r180 top
M1 "Mark" Mark 6840.79,7555 r180 top
M1 "Mark" Mark 8791.57,7555 r180 top
R1 "0R/0805" R0805-GF 9382.2,10438.19 r0 top
R1 "0R/0805" R0805-GF 9382.2,9194.09 r0 top
R1 "0R/0805" R0805-GF 7431.42,10438.19 r0 top
R1 "0R/0805" R0805-GF 7431.42,9194.09 r0 top
R1 "0R/0805" R0805-GF 5480.63,10438.19 r0 top
R1 "0R/0805" R0805-GF 5480.63,9194.09 r0 top
R1 "0R/0805" R0805-GF 5480.63,7950 r0 top
R1 "0R/0805" R0805-GF 7431.42,7950 r0 top
R1 "0R/0805" R0805-GF 9382.2,7950 r0 top
R2 "4.7KΩ" R0402-GF 9621.57,10762.87 r270 top
R2 "4.7KΩ" R0402-GF 9621.57,9518.78 r270 top
R2 "4.7KΩ" R0402-GF 7670.79,10762.87 r270 top
R2 "4.7KΩ" R0402-GF 7670.79,9518.78 r270 top
R2 "4.7KΩ" R0402-GF 5720,10762.87 r270 top
R2 "4.7KΩ" R0402-GF 5720,9518.78 r270 top
R2 "4.7KΩ" R0402-GF 5720,8274.69 r270 top
R2 "4.7KΩ" R0402-GF 7670.79,8274.69 r270 top
R2 "4.7KΩ" R0402-GF 9621.57,8274.69 r270 top
R3 "10KΩ" R0402-GF 9521.57,10828.19 r180 top
R3 "10KΩ" R0402-GF 9521.57,9584.09 r180 top
R3 "10KΩ" R0402-GF 7570.79,10828.19 r180 top
R3 "10KΩ" R0402-GF 7570.79,9584.09 r180 top
R3 "10KΩ" R0402-GF 5620,10828.19 r180 top
R3 "10KΩ" R0402-GF 5620,9584.09 r180 top
R3 "10KΩ" R0402-GF 5620,8340 r180 top
R3 "10KΩ" R0402-GF 7570.79,8340 r180 top
R3 "10KΩ" R0402-GF 9521.57,8340 r180 top
R4 "100K" R0603-GF 9066.57,10498.19 r90 top
R4 "100K" R0603-GF 9066.57,9254.09 r90 top
R4 "100K" R0603-GF 7115.79,10498.19 r90 top
R4 "100K" R0603-GF 7115.79,9254.09 r90 top
R4 "100K" R0603-GF 5165,10498.19 r90 top
R4 "100K" R0603-GF 5165,9254.09 r90 top
R4 "100K" R0603-GF 5165,8010 r90 top
R4 "100K" R0603-GF 7115.79,8010 r90 top
R4 "100K" R0603-GF 9066.57,8010 r90 top
R5 "10K±1%" R0603-GF 9031.57,10593.19 r0 top
R5 "10K±1%" R0603-GF 9031.57,9349.09 r0 top
R5 "10K±1%" R0603-GF 7080.79,10593.19 r0 top
R5 "10K±1%" R0603-GF 7080.79,9349.09 r0 top
R5 "10K±1%" R0603-GF 5130,10593.19 r0 top
R5 "10K±1%" R0603-GF 5130,9349.09 r0 top
R5 "10K±1%" R0603-GF 5130,8105 r0 top
R5 "10K±1%" R0603-GF 7080.79,8105 r0 top
R5 "10K±1%" R0603-GF 9031.57,8105 r0 top
R6 "0R/0805" R0805-GF 9166.57,10497.56 r90 top
R6 "0R/0805" R0805-GF 9166.57,9253.46 r90 top
R6 "0R/0805" R0805-GF 7215.79,10497.56 r90 top
R6 "0R/0805" R0805-GF 7215.79,9253.46 r90 top
R6 "0R/0805" R0805-GF 5265,10497.56 r90 top
R6 "0R/0805" R0805-GF 5265,9253.46 r90 top
R6 "0R/0805" R0805-GF 5265,8009.37 r90 top
R6 "0R/0805" R0805-GF 7215.79,8009.37 r90 top
R6 "0R/0805" R0805-GF 9166.57,8009.37 r90 top
T1 "DLW43SH510XK2L" L-ACT45B 9891.57,10598.19 r90 top
T1 "DLW43SH510XK2L" L-ACT45B 9891.57,9354.09 r90 top
T1 "DLW43SH510XK2L" L-ACT45B 7940.79,10598.19 r90 top
T1 "DLW43SH510XK2L" L-ACT45B 7940.79,9354.09 r90 top
T1 "DLW43SH510XK2L" L-ACT45B 5990,10598.19 r90 top
T1 "DLW43SH510XK2L" L-ACT45B 5990,9354.09 r90 top
T1 "DLW43SH510XK2L" L-ACT45B 5990,8110 r90 top
T1 "DLW43SH510XK2L" L-ACT45B 7940.79,8110 r90 top
T1 "DLW43SH510XK2L" L-ACT45B 9891.57,8110 r90 top
TP1 "TP" TP 9141.57,10348.19 r180 top
TP1 "TP" TP 9141.57,9104.09 r180 top
TP1 "TP" TP 7190.79,10348.19 r180 top
TP1 "TP" TP 7190.79,9104.09 r180 top
TP1 "TP" TP 5240,10348.19 r180 top
TP1 "TP" TP 5240,9104.09 r180 top
TP1 "TP" TP 5240,7860 r180 top
TP1 "TP" TP 7190.79,7860 r180 top
TP1 "TP" TP 9141.57,7860 r180 top
TP2 "TP" TP 9256.57,10678.19 r180 top
TP2 "TP" TP 9256.57,9434.09 r180 top
TP2 "TP" TP 7305.79,10678.19 r180 top
TP2 "TP" TP 7305.79,9434.09 r180 top
TP2 "TP" TP 5355,10678.19 r180 top
TP2 "TP" TP 5355,9434.09 r180 top
TP2 "TP" TP 5355,8190 r180 top
TP2 "TP" TP 7305.79,8190 r180 top
TP2 "TP" TP 9256.57,8190 r180 top
TP3 "TP" TP 9426.57,10603.19 r180 top
TP3 "TP" TP 9426.57,9359.09 r180 top
TP3 "TP" TP 7475.79,10603.19 r180 top
TP3 "TP" TP 7475.79,9359.09 r180 top
TP3 "TP" TP 5525,10603.19 r180 top
TP3 "TP" TP 5525,9359.09 r180 top
TP3 "TP" TP 5525,8115 r180 top
TP3 "TP" TP 7475.79,8115 r180 top
TP3 "TP" TP 9426.57,8115 r180 top
TP4 "TP" TP 9536.57,10878.19 r180 top
TP4 "TP" TP 9536.57,9634.09 r180 top
TP4 "TP" TP 7585.79,10878.19 r180 top
TP4 "TP" TP 7585.79,9634.09 r180 top
TP4 "TP" TP 5635,10878.19 r180 top
TP4 "TP" TP 5635,9634.09 r180 top
TP4 "TP" TP 5635,8390 r180 top
TP4 "TP" TP 7585.79,8390 r180 top
TP4 "TP" TP 9536.57,8390 r180 top
TP5 "TP" TP 9571.57,10708.19 r180 top
TP5 "TP" TP 9571.57,9464.09 r180 top
TP5 "TP" TP 7620.79,10708.19 r180 top
TP5 "TP" TP 7620.79,9464.09 r180 top
TP5 "TP" TP 5670,10708.19 r180 top
TP5 "TP" TP 5670,9464.09 r180 top
TP5 "TP" TP 5670,8220 r180 top
TP5 "TP" TP 7620.79,8220 r180 top
TP5 "TP" TP 9571.57,8220 r180 top
TP6 "TP" TP 9856.57,10838.19 r0 top
TP6 "TP" TP 9856.57,9594.09 r0 top
TP6 "TP" TP 7905.79,10838.19 r0 top
TP6 "TP" TP 7905.79,9594.09 r0 top
TP6 "TP" TP 5955,10838.19 r0 top
TP6 "TP" TP 5955,9594.09 r0 top
TP6 "TP" TP 5955,8350 r0 top
TP6 "TP" TP 7905.79,8350 r0 top
TP6 "TP" TP 9856.57,8350 r0 top
TP7 "TP" TP 9761.57,10853.19 r180 top
TP7 "TP" TP 9761.57,9609.09 r180 top
TP7 "TP" TP 7810.79,10853.19 r180 top
TP7 "TP" TP 7810.79,9609.09 r180 top
TP7 "TP" TP 5860,10853.19 r180 top
TP7 "TP" TP 5860,9609.09 r180 top
TP7 "TP" TP 5860,8365 r180 top
TP7 "TP" TP 7810.79,8365 r180 top
TP7 "TP" TP 9761.57,8365 r180 top
TP8 "TP" TP 9011.57,10528.19 r180 top
TP8 "TP" TP 9011.57,9284.09 r180 top
TP8 "TP" TP 7060.79,10528.19 r180 top
TP8 "TP" TP 7060.79,9284.09 r180 top
TP8 "TP" TP 5110,10528.19 r180 top
TP8 "TP" TP 5110,9284.09 r180 top
TP8 "TP" TP 5110,8040 r180 top
TP8 "TP" TP 7060.79,8040 r180 top
TP8 "TP" TP 9011.57,8040 r180 top
TP9 "TP" TP 9161.57,10593.19 r180 top
TP9 "TP" TP 9161.57,9349.09 r180 top
TP9 "TP" TP 7210.79,10593.19 r180 top
TP9 "TP" TP 7210.79,9349.09 r180 top
TP9 "TP" TP 5260,10593.19 r180 top
TP9 "TP" TP 5260,9349.09 r180 top
TP9 "TP" TP 5260,8105 r180 top
TP9 "TP" TP 7210.79,8105 r180 top
TP9 "TP" TP 9161.57,8105 r180 top
U1 "LN20542Q1-DFR" U-LN20542Q1 9508.6,10682.3 r180 top
U1 "LN20542Q1-DFR" U-LN20542Q1 9508.6,9438.21 r180 top
U1 "LN20542Q1-DFR" U-LN20542Q1 7557.81,10682.3 r180 top
U1 "LN20542Q1-DFR" U-LN20542Q1 7557.81,9438.21 r180 top
U1 "LN20542Q1-DFR" U-LN20542Q1 5607.03,10682.3 r180 top
U1 "LN20542Q1-DFR" U-LN20542Q1 5607.03,9438.21 r180 top
U1 "LN20542Q1-DFR" U-LN20542Q1 5607.03,8194.12 r180 top
U1 "LN20542Q1-DFR" U-LN20542Q1 7557.81,8194.12 r180 top
U1 "LN20542Q1-DFR" U-LN20542Q1 9508.6,8194.12 r180 top

## Footprints (in the part's own frame and the unit in brackets; to place one, negate y for a bottom-side part, rotate by r counter-clockwise, add the part's x,y. Pads: shape width x height; smd on the part's side, far side on the other; paste and mask are expansions set on the pad)
C0402-GF [mm]
  rect 0.4x0.6 smd: 1(0.5,0) 2(-0.5,0)
  silkscreen extent -0.88,-0.49 0.89,0.49, body extent -0.51,-0.25 0.49,0.25, height 0.5
C0603-GF [mm]
  rect 0.95x1 smd: 1(0,0) 2(1.6,0)
  silkscreen extent -0.68,-0.7 2.27,0.7, body extent 0,-0.4 1.6,0.4, height 0.3
C0805-GF [mm]
  rect 1x1.25 smd: 1(0,0) 2(2,0)
  silkscreen extent -0.74,-0.85 2.73,0.85, body extent -0.01,-0.63 1.99,0.62, height 0.78
C1206-GF [mm]
  rect 1.5x1.8 smd: 1(0,0) 2(3,0)
  silkscreen extent -0.95,-1.12 3.99,1.11, body extent -0.21,-0.8 2.99,0.8, height 1
D-SMA [mm]
  rect 2x2.5 smd: 1(0,0) 2(5,0)
  silkscreen extent -1.25,-1.57 6.48,1.59, body extent -0.29,-1.44 5.31,1.48, height 2.3
D-SMB-TVS [mm]
  rect 2x3.2 smd: 1(0.021,-0.004) 2(5.221,-0.004)
  silkscreen extent -1.25,-2.13 6.47,2.23, body extent -0.22,-1.91 5.38,1.99, height 2.5
D-SOT-23 [mil]
  rect 36x36 smd: 1(-37.17,-39.66) 2(37.83,-39.66)
  rect 36x50 smd: 3(0.83,40.34)
  silkscreen extent -57,-45 58,45, body extent -56,-53 58,57, height 47
EC8X10 [mm]
  rect 3.9x1.9 smd: 1(3.5,0) 2(-3.5,0)
  silkscreen extent -4.5,-4.5 5.51,4.5, body extent -4.53,-4.16 4.47,4.14, height 10.5
GF-二维码框 [mil]
  silkscreen extent -1,-317 314,-2
L-ACT45B [mm]
  rect 1.5x1 smd: 1(0,0) 2(0,2.5) 3(4.55,0) 4(4.55,2.5)
  silkscreen extent -0.09,-0.56 4.57,2.98, body extent -0.22,-0.39 4.61,2.83, height 2.8
Mark [mil]
  round 60 smd: 1(0,0)
  round 60 smd far side: 1(0,0)
  Top Layer circle w12: c0.94,0 r59.06
  Bottom Layer circle w12: c0.94,0 r59.06
PH2.2-5 [mm]
  round 1.6 hole 0.95: 1(-4.4,0) 2(-2.2,0) 3(0,0) 4(2.2,0) 5(4.4,0)
  silkscreen extent -6.15,-1.4 6.09,1.4
R0402-GF [mm]
  rect 0.4x0.6 smd: 1(0.5,0) 2(-0.5,0)
  silkscreen extent -0.88,-0.49 0.89,0.49, body extent -0.4,-0.28 0.6,0.22, height 0.32
R0603-GF [mm]
  rect 0.95x1 smd: 1(-0.8,0) 2(0.8,0)
  silkscreen extent -1.48,-0.7 1.47,0.7, body extent -0.81,-0.41 0.79,0.39, height 0.45
R0805-GF [mm]
  rect 1x1.4 smd: 1(-1,0) 2(1,0)
  silkscreen extent -1.72,-0.9 1.71,0.91, body extent -0.98,-0.64 1.02,0.62, height 0.55
R1206-GF [mm]
  rect 1.3x1.7 smd: 1(-1.55,0) 2(1.55,0)
  silkscreen extent -2.41,-1.07 2.43,1.05, body extent -1.63,-0.79 1.57,0.81, height 0.6
TP [mm]
  round 1 smd: 1(0,0)
U-LN20542Q1 [mm]
  rect 1.7x1.9 smd: 0(2.464,-1.038)
  rect 1.5x0.38 smd: 1(0,0)
  oval 1.5x0.38 smd: 2(0,-0.65) 4(0,-1.95) 5(4.844,-1.95) 7(4.844,-0.65) 8(4.844,0)
  oval 1.5x0.38 smd mask+0: 3(0,-1.3) 6(4.844,-1.3)
  silkscreen extent -0.12,-2.55 3.66,0.81, body extent -0.1,-2.52 4.95,0.58, height 1.09
正耀-R2003HS-7P [mm]
  rect 1.4x2.5 hole 0.85: 1(0,0)
  oval 1.4x2.5 hole 0.85: 2(2,0) 3(4,0) 4(6,0) 5(8,0) 6(10,0) 7(12,0)
  silkscreen extent -2,-2.12 14.05,2.37, body extent -1.6,-1.93 13.6,1.47, height 6.1

## Part data
*R1 *R1 *R1 *R1 *R1 *R1 *R1 *R1 *R1 *R2 *R2 *R2 *R2 *R2 *R2 *R2 *R2 *R2: library part 1206-3.3KΩ±1%-1/4W, 品牌=YAGEO, 封装=1206, 物料代码=ZR0000003953, 物料名称=贴片电阻, 规格型号=1206-3.3KΩ±1%-1/4W
C1 C1 C1 C1 C1 C1 C1 C1 C1 C14 C14 C14 C14 C14 C14 C14 C14 C14: library part 1206-4.7UF±10%-50V-X7R, 品牌=YAGEO, 封装=1206, 物料代码=ZRB000000260, 物料名称=贴片电容, 规格型号=1206-4.7UF±10%-50V-X7R
C2 C2 C2 C2 C2 C2 C2 C2 C2: library part 0603-47NF±10%-50V, 品牌=YAGEO, 封装=0603, 物料代码=ZRB000000228, 物料名称=贴片电容, 规格型号=0603-47NF±10%-50V
C3 C3 C3 C3 C3 C3 C3 C3 C3: library part 0603-470NF±10%-50V-X7R, 品牌=YAGEO, 封装=0603, 物料代码=ZRB000000231, 物料名称=贴片电容, 规格型号=0603-470NF±10%-50V-X7R
C4 C4 C4 C4 C4 C4 C4 C4 C4: library part 0603-100NF±10%-100V, 品牌=YAGEO, 封装=0603, 物料代码=ZRB000000230, 物料名称=贴片电容, 规格型号=0603-100NF±10%-100V
C5 C5 C5 C5 C5 C5 C5 C5 C5 C13 C13 C13 C13 C13 C13 C13 C13 C13: library part 0402-100NF±10%-50V, 品牌=YAGEO, 封装=0402, 物料代码=ZR0000004104, 物料名称=贴片电容, 规格型号=0402-100NF±10%-50V
C6 C6 C6 C6 C6 C6 C6 C6 C6: library part 0805-10UF±10%-10V-X7R, 品牌=YAGEO, 封装=0805, 物料代码=ZRB000000257, 物料名称=贴片电容, 规格型号=0805-10UF±10%-10V-X7R
C7 C7 C7 C7 C7 C7 C7 C7 C7 C8 C8 C8 C8 C8 C8 C8 C8 C8: library part 0603-10NF±10%-100V, 品牌=YAGEO, 封装=0603, 物料代码=ZRB000000226, 物料名称=贴片电容, 规格型号=0603-10NF±10%-100V
C9 C9 C9 C9 C9 C9 C9 C9 C9: library part 0402-1NF±10%-50V, 品牌=YAGEO, 封装=0402, 物料代码=ZR0000004054, 物料名称=贴片电容, 规格型号=0402-1NF±10%-50V
C10 C10 C10 C10 C10 C10 C10 C10 C10 C12 C12 C12 C12 C12 C12 C12 C12 C12: library part 0603-47PF±5%-100V(C), 品牌=YAGEO, 封装=0603, 物料代码=ZRB000000234, 物料名称=贴片电容, 规格型号=0603-47PF±5%-100V(C)
C11 C11 C11 C11 C11 C11 C11 C11 C11: library part 0603-4.7NF±10%-50V, 品牌=YAGEO, 封装=0603, 物料代码=ZRB000000224, 物料名称=贴片电容, 规格型号=0603-4.7NF±10%-50V
D1 D1 D1 D1 D1 D1 D1 D1 D1: "贴片二极管", 品牌=ǿï, 封装=SMA, 物料代码=DG0000000006, 物料名称=贴片二极管, 规格型号=GS1M-AU
D2 D2 D2 D2 D2 D2 D2 D2 D2: library part SMBJ33CA-瞬雷, "贴片TVS管", 品牌=瞬雷, 封装=SMB, 物料代码=DGB000003946, 物料名称=贴片TVS管, 规格型号=SMBJ33CA
D3 D3 D3 D3 D3 D3 D3 D3 D3: "贴片ESD管", 品牌=Nexperia, 封装=SOT-23, 物料代码=DGB000003988, 物料名称=贴片ESD管, 规格型号=AESD24G2B
EC1 EC1 EC1 EC1 EC1 EC1 EC1 EC1 EC1: library part VZH101M1VTR-0810, "贴片铝电解电容", 品牌=立隆, 封装=0810, 物料代码=ZR0000000273, 物料名称=贴片铝电解电容, 规格型号=VZH101M1VTR-0810
J1 J1 J1 J1 J1 J1 J1 J1 J1: "分离式连接器", 品牌=昆山正耀, 物料代码=JC0000000082, 物料名称=分离式连接器, 规格型号=R2003HS-7P
R1 R1 R1 R1 R1 R1 R1 R1 R1 R6 R6 R6 R6 R6 R6 R6 R6 R6: library part 0805-0Ω±5%-1/8W, 品牌=YAGEO, 封装=0805, 物料代码=ZRB000000041, 物料名称=贴片电阻, 规格型号=0805-0Ω±5%-1/8W
R2 R2 R2 R2 R2 R2 R2 R2 R2: library part 0402-4.7KΩ±1%-1/16W, 品牌=YAGEO, 封装=0402, 物料代码=ZR0000004052, 物料名称=贴片电阻, 规格型号=0402-4.7KΩ±1%-1/16W
R3 R3 R3 R3 R3 R3 R3 R3 R3: library part 0402-10KΩ±1%-1/16W, 品牌=YAGEO, 封装=0402, 物料代码=ZR0000004051, 物料名称=贴片电阻, 规格型号=0402-10KΩ±1%-1/16W
R4 R4 R4 R4 R4 R4 R4 R4 R4: library part 0603-100KΩ±5%-1/10W, 品牌=YAGEO, 封装=0603, 物料代码=ZRB000000028, 物料名称=贴片电阻, 规格型号=0603-100KΩ±5%-1/10W
R5 R5 R5 R5 R5 R5 R5 R5 R5: library part 0603-10KΩ±1%-1/10W, 品牌=YAGEO, 封装=0603, 物料代码=ZRB000000139, 物料名称=贴片电阻, 规格型号=0603-10KΩ±1%-1/10W
T1 T1 T1 T1 T1 T1 T1 T1 T1: "贴片电感-共模", 品牌=Murata, 物料代码=TZB000000009, 物料名称=贴片电感-共模, 规格型号=DLW43SH510XK2L
U1 U1 U1 U1 U1 U1 U1 U1 U1: 品牌=领芯, 物料代码=XPB000000106, 物料名称=电源芯片, 规格型号=LN20542Q1-DFR

## Via types
v1: diameter 24, hole 12, Top Layer to Bottom Layer, tented both sides, 1918 vias
v2: diameter 16, hole 8, Top Layer to Bottom Layer, tented both sides, 45 vias

## Nets (pads, with @x,y where several pads share a name; then routed paths per layer and width w, separated by ;. In a path a pad name is that pad's centre, name@x,y a point inside that pad or via, vN(x,y) a via of type N, cw(c..) or ccw(c..) an arc to the next point about the centre after c; other vN are vias at no path point)
BAT_12V: 
CANH: 
CANL: 
GND: 
HALL_5V: 
IGN: 
MCU_AI_BAT_12V: 
MCU_DO_HALL_5V: 
NetC1_2: 
NetC7_2: 
NetC9_1: 
P_CANH: 
P_CANL: 
POWER: 
SPLIT: 
pads on no net: *R1.1 *R1.2 *R2.1 *R2.2 C1.1 C1.2 C2.1 C2.2 C3.1 C3.2 C4.1 C4.2 C5.1 C5.2 C6.1 C6.2 C7.1 C7.2 C8.1 C8.2 C9.1 C9.2 C10.1 C10.2 C11.1 C11.2 C12.1 C12.2 C13.1 C13.2 C14.1 C14.2 D1.1 D1.2 D2.1 D2.2 D3.1 D3.2 D3.3 EC1.1 EC1.2 J1.1 J1.2 J1.3 J1.4 J1.5 J1.6 J1.7 J2.1 J2.2 J2.3 J2.4 J2.5 M1.1 R1.1 R1.2 R2.1 R2.2 R3.1 R3.2 R4.1 R4.2 R5.1 R5.2 R6.1 R6.2 T1.1 T1.2 T1.3 T1.4 TP1.1 TP2.1 TP3.1 TP4.1 TP5.1 TP6.1 TP7.1 TP8.1 TP9.1 U1.0 U1.1 U1.2 U1.3 U1.4 U1.5 U1.6 U1.7 U1.8